# Altium PCB PCB1.PcbDoc
Units mm, origin at the board's own origin, x right, y up, seen from the top; angles counter-clockwise.
Board outline 180 x 80 mm, 2 copper layers (Top Layer, Bottom Layer); 75 components, 62 nets, 261 pads, 58 vias.
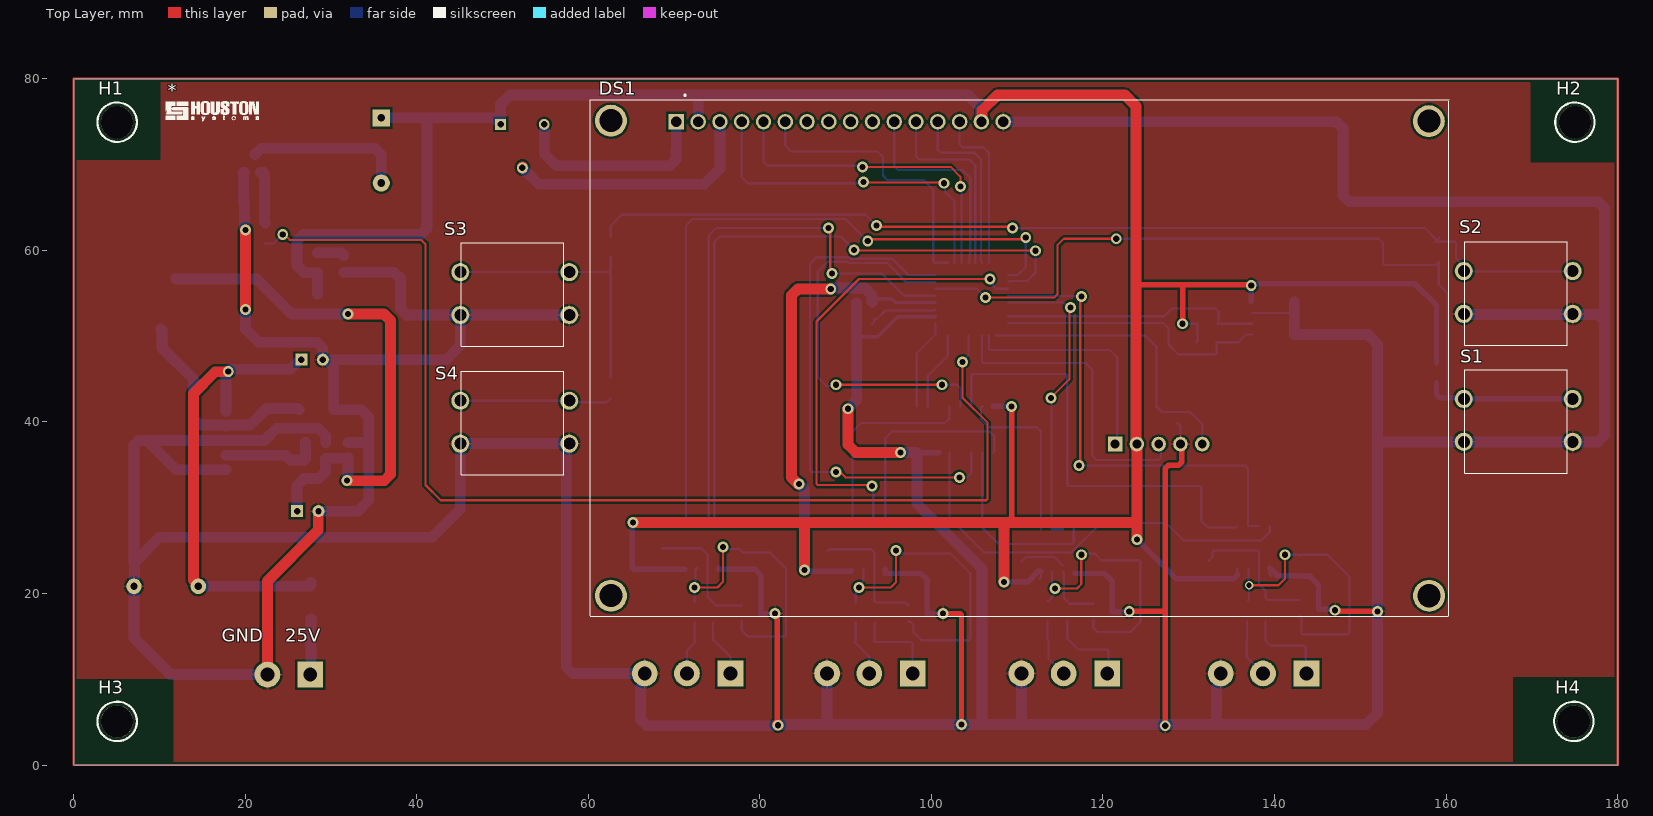
[diagram p0: Top Layer view]
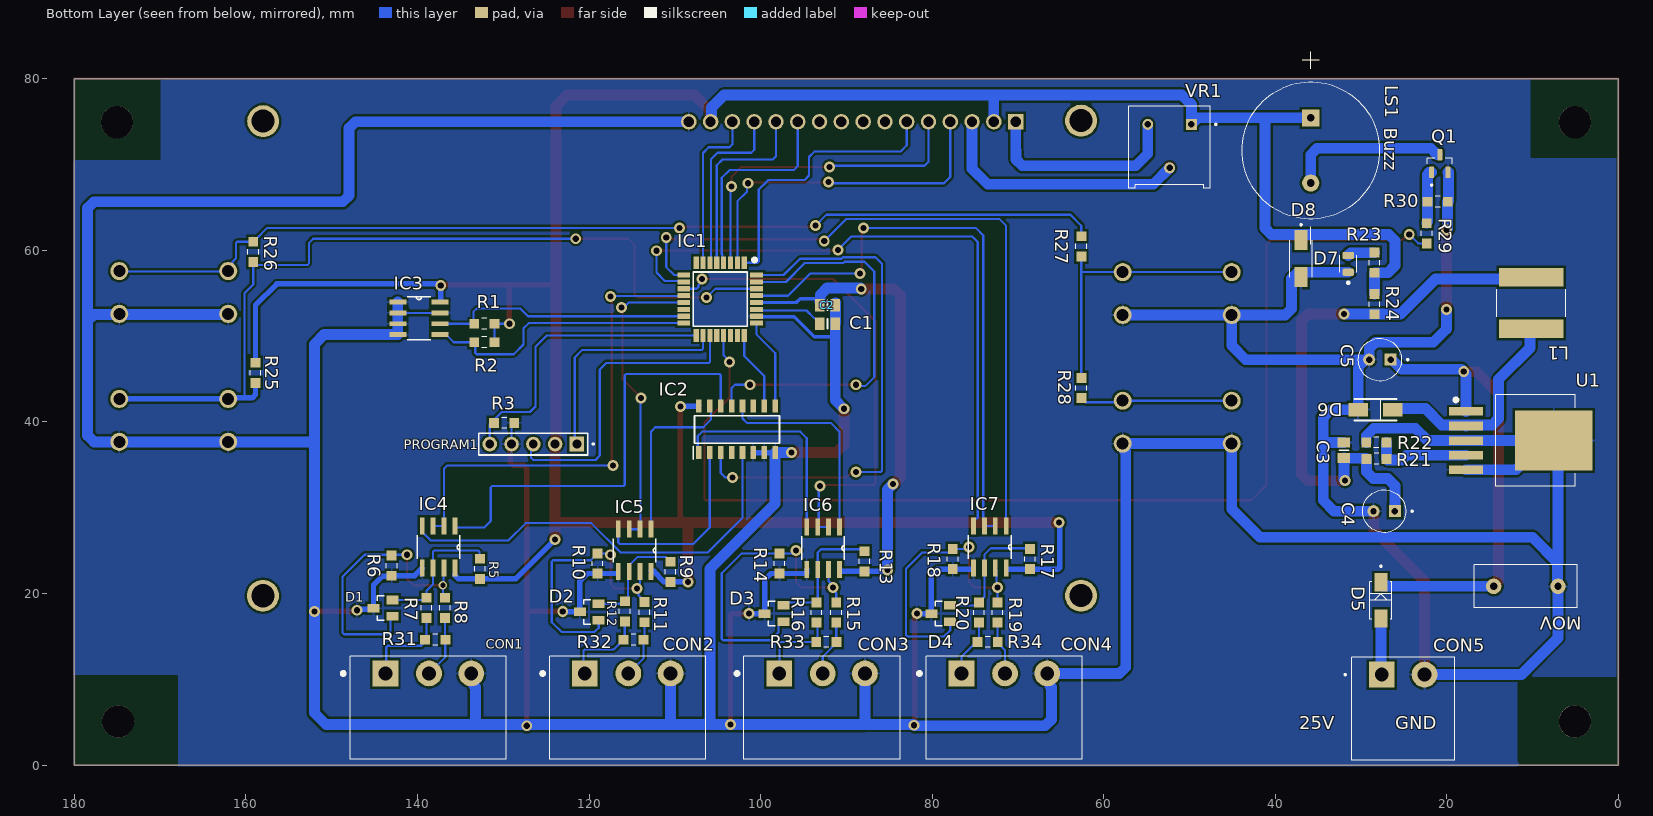
[diagram p1: Bottom Layer view, seen from below]
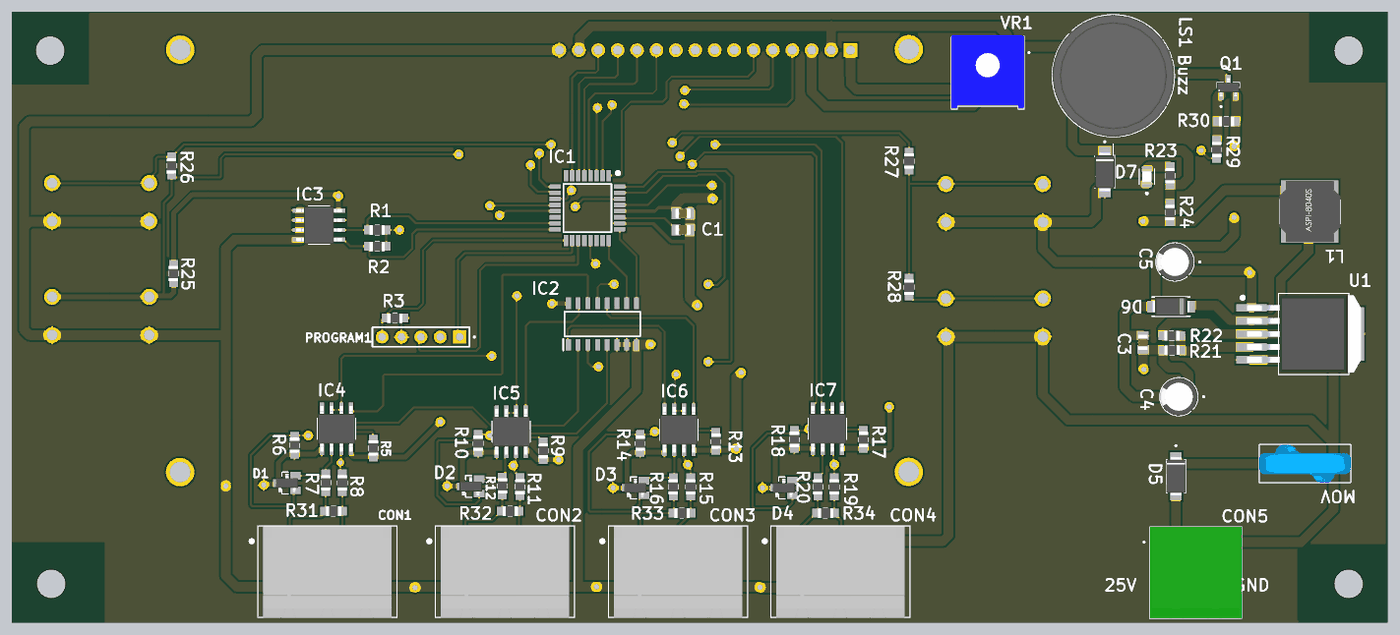
[diagram p2: 3D render of the assembled board from below, using the file's embedded part models]

## Layer stack, top to bottom
Top Solder: solder mask 0.0102, Solder Resist, Dk 3.5
Top Layer: signal copper 0.0356
Dielectric 1: dielectric 0.32, FR-4, Dk 4.8
Bottom Layer: signal copper 0.0356
Bottom Solder: solder mask 0.0102, Solder Resist, Dk 3.5

## Board outline
0,0 0,80 180,80 180,0

## Design rules (kind name [scope] priority, off if disabled: settings)
Clearance [All] p1: gap=0.254 ignorepadtopadclearanceinfootprint=TRUE
HoleSize [All] p1: absolutevalues=TRUE maxlimit=5 minlimit=0.025 maxpercent=80.000 minpercent=20.000
MinimumSolderMaskSliver [All] p1: minsoldermaskwidth=0.1
PolygonConnect [All] p1: connectstyle=Relief reliefconductorwidth=0.254 reliefentries=4 polygonreliefangle="90 Angle" airgapwidth=0.254
RoutingVias [All] p1: holewidth=0.711 width=1.27 viastyle="Through Hole" minholewidth=0.4 minwidth=0.8 maxholewidth=0.711 maxwidth=1.27
SilkToSilkClearance [All] p1: silktosilkclearance=0.1
SilkToSolderMaskClearance [IsPad] p1: minsilkscreentomaskgap=0.001 clearancetoexposedcopper=TRUE
SolderMaskExpansion [All] p1: expansion=0.102 istentingtop=FALSE
Width [All] p1: maxlimit=5.254 minlimit=0.254 preferedwidth=0.254
26 further rules are at their usual default settings.

## Classes and differential pairs
component class Power: * buzz C3 C4 C5 CON5 D5 D6 D7 D8 H1 H2 H3 H4 L1 LS1 MOV Q1 R21 R22 R23 R24 R29 R30 U1
component class main: C1 C2 dispaly DS1 IC1 IC3 PROGRAM1 R1 R2 R3 R25 R26 R27 R28 S1 S2 S3 S4 VR1
component class Commucation: CON1 CON2 CON3 CON4 D1 D2 D3 D4 IC2 IC4 IC5 IC6 IC7 R5 R6 R7 R8 R9 R10 R11 R12 R13 R14 R15 R16 R17 R18 R19 R20 R31 R32 R33 R34

## Components (designator, comment, footprint, x,y, rotation, side; value= is the part's Value field where it differs from the comment)
* "HOUSTON_LOGO" HOUSTON_LOGO 14.097,72.517 r0 top
C1 "CAP 0.1uF 50V 0805" "CAP CER 0.1uF/50V 5%" 92.202,51.435 r180 bottom
C2 "CAP 0.1uF 50V 0805" "CAP CER 0.1uF/50V 5%" 92.202,53.594 r180 bottom
C3 "CAP 0.1uF 50V 0805" "CAP CER 0.1uF/50V 5%" 32.004,36.703 r270 bottom
C4 "CAP ELE 10µF 25V TH" "CAP ELE 10µF 25V TH" 27.305,29.591 r0 bottom
C5 "CAP ELE 10µF 25V TH" "CAP ELE 10µF 25V TH" 27.813,47.244 r0 bottom
CON1 "3 Pin Terminal Block 5MM RA" "3 Pin Terminal Block 5MM RA" 138.731,10.668 r180 bottom
CON2 "3 Pin Terminal Block 5MM RA" "3 Pin Terminal Block 5MM RA" 115.49,10.668 r180 bottom
CON3 "3 Pin Terminal Block 5MM RA" "3 Pin Terminal Block 5MM RA" 92.838,10.668 r180 bottom
CON4 "3 Pin Terminal Block 5MM RA" "3 Pin Terminal Block 5MM RA" 71.581,10.668 r180 bottom
CON5 "2 Pin Terminal Block 5MM RA" "2 Pin Terminal Block 5MM RA" 27.606,10.541 r180 bottom
D1 "SM712-02HTG" SOT23 144.018,18.288 r90 bottom
D2 "SM712-02HTG" SOT23 119.972,17.846 r90 bottom
D3 "SM712-02HTG" SOT23 98.425,17.653 r90 bottom
D4 "SM712-02HTG" SOT23 78.994,17.653 r90 bottom
D5 "DIODE M7 DO-214AC" "DIODE M7 DO-214AC" 27.686,19.177 r270 bottom
D6 "SS54-HF" DIOM5025X220N 28.321,41.402 r0 bottom
D7 "LED-0805" LED-0805 31.496,58.42 r90 bottom
D8 "SZ1SMA5918BT3G" DIOM5226X220N 36.998,59.035 r270 bottom
DS1 "NHD-0420E2Z-FSW-GBW" LCD_NHD-0420E2Z-FSW-GBW 126.273,45.901 r0 top locked
H1 "ScrewHole_3.75mmD" "ScrewHole_3.75mmD - duplicate" 5.08,74.93 r0 top
H2 "ScrewHole_3.75mmD" "ScrewHole_3.75mmD - duplicate" 175.006,74.93 r0 top
H3 "ScrewHole_3.75mmD" "ScrewHole_3.75mmD - duplicate" 5.08,5.08 r0 top
H4 "ScrewHole_3.75mmD" "ScrewHole_3.75mmD - duplicate" 174.879,5.08 r0 top
IC1 "MG82F6D32AD32" QFP80P900X900X160-32N 104.705,54.309 r270 bottom
IC2 "CD4052BM" SOIC127P600X175-16N 102.743,39.116 r90 bottom
IC3 "AT24C512BN-SH25-B" SOIC127P600X175-8N 139.827,52.07 r180 bottom
IC4 "MAX485CSA" SOIC127P600X175-8N 137.541,25.4 r270 bottom
IC5 "MAX485CSA" SOIC127P600X175-8N 114.681,25.019 r270 bottom
IC6 "MAX485CSA" SOIC127P600X175-8N 92.71,25.273 r270 bottom
IC7 "MAX485CSA" SOIC127P600X175-8N 73.279,25.4 r270 bottom
L1 "INDUCTOR 8040S SWPA8040S120MT" "INDUCTOR 8040S SWPA8040S120MT" 10.16,53.848 r90 bottom
LS1 "Buzz" CUI_CMI-1614-1285T 35.871,71.636 r270 bottom
MOV "Ceramic capacitor 3300pF4KV" "Ceramic capacitor 3300pF4KV" 10.795,20.828 r0 bottom
PROGRAM1 "BURGE 5 PIN 2.54mm" "BURGE 5 PIN" 126.492,37.415 r180 bottom
Q1 "NPN SOT-23 SMT BC848C_RFG" "NPN SOT-23 SMT BC848C_RFG" 20.828,70.104 r90 bottom
R1 "RES 4.7K 0.25W 5% 0805" "RES 0805 10K/0.25W 5%" 132.207,51.435 r180 bottom
R2 "RES 47K 0.25W 5% 0805" "RES 0805 10K/0.25W 5%" 132.207,49.276 r180 bottom
R3 "RES 47K 0.25W 5% 0805" "RES 0805 10K/0.25W 5%" 129.889,39.878 r0 bottom
R5 "RES4.7K 0.25W 5% 0805" "RES 0805 10K/0.25W 5%" 132.715,22.86 r90 bottom
R6 "RES4.7K 0.25W 5% 0805" "RES 0805 10K/0.25W 5%" 143.002,23.241 r90 bottom
R7 "RES100E 0.25W 5% 0805" "RES 0805 10K/0.25W 5%" 138.938,18.32 r270 bottom
R8 "RES100E 0.25W 5% 0805" "RES 0805 10K/0.25W 5%" 136.779,18.32 r270 bottom
R9 "RES4.7K 0.25W 5% 0805" "RES 0805 10K/0.25W 5%" 110.49,22.511 r90 bottom
R10 "RES4.7K 0.25W 5% 0805" "RES 0805 10K/0.25W 5%" 118.999,23.495 r90 bottom
R11 "RES100E 0.25W 5% 0805" "RES 0805 10K/0.25W 5%" 113.538,17.812 r270 bottom
R12 "RES100E 0.25W 5% 0805" "RES 0805 10K/0.25W 5%" 115.824,17.907 r270 bottom
R13 "RES4.7K 0.25W 5% 0805" "RES 0805 10K/0.25W 5%" 87.884,23.749 r90 bottom
R14 "RES4.7K 0.25W 5% 0805" "RES 0805 10K/0.25W 5%" 97.79,23.495 r90 bottom
R15 "RES100E 0.25W 5% 0805" "RES 0805 10K/0.25W 5%" 91.186,17.78 r270 bottom
R16 "RES100E 0.25W 5% 0805" "RES 0805 10K/0.25W 5%" 93.472,17.78 r270 bottom
R17 "RES4.7K 0.25W 5% 0805" "RES 0805 10K/0.25W 5%" 68.58,24.003 r90 bottom
R18 "RES4.7K 0.25W 5% 0805" "RES 0805 10K/0.25W 5%" 77.597,24.003 r90 bottom
R19 "RES100E 0.25W 5% 0805" "RES 0805 10K/0.25W 5%" 72.39,17.78 r270 bottom
R20 "RES100E 0.25W 5% 0805" "RES 0805 10K/0.25W 5%" 74.549,17.78 r270 bottom
R21 "RES 3K 0.25W 5% 0805" "RES 0805 10K/0.25W 5%" 28.194,35.687 r0 bottom
R22 "RES 1K 0.25W 5% 0805" "RES 0805 10K/0.25W 5%" 28.226,37.592 r180 bottom
R23 "RES 3K 0.25W 5% 0805" "RES 0805 10K/0.25W 5%" 28.448,58.547 r90 bottom
R24 "RES 3K 0.25W 5% 0805" "RES 0805 10K/0.25W 5%" 28.448,53.721 r270 bottom
R25 "RES 10K 0.25W 5% 0805" "RES 0805 10K/0.25W 5%" 158.877,45.72 r90 bottom
R26 "RES 1K 0.25W 5% 0805" "RES 0805 10K/0.25W 5%" 159.131,59.817 r270 bottom
R27 "RES 1K 0.25W 5% 0805" "RES 0805 10K/0.25W 5%" 62.611,60.452 r90 bottom
R28 "RES 1K 0.25W 5% 0805" "RES 0805 10K/0.25W 5%" 62.611,43.942 r90 bottom
R29 "RES 1K 0.25W 5% 0805" "RES 0805 10K/0.25W 5%" 22.352,61.976 r270 bottom
R30 "RES 10K 0.25W 5% 0805" "RES 0805 10K/0.25W 5%" 21.082,65.659 r180 bottom
R31 "RES120E 0.25W 5% 0805" "RES 0805 10K/0.25W 5%" 137.922,14.605 r180 bottom
R32 "RES120E 0.25W 5% 0805" "RES 0805 10K/0.25W 5%" 114.808,14.605 r180 bottom
R33 "RES120E 0.25W 5% 0805" "RES 0805 10K/0.25W 5%" 92.329,14.351 r180 bottom
R34 "RES120E 0.25W 5% 0805" "RES 0805 10K/0.25W 5%" 73.533,14.351 r180 bottom
S1 "1241.1624.41" 1241162441 174.752,42.672 r180 top locked
S2 "1241.1624.41" 1241162441 174.752,57.578 r180 top locked
S3 "1241.1624.41" 1241162441 57.785,57.451 r180 top locked
S4 "1241.1624.41" 1241162441 57.785,42.465 r180 top locked
U1 "LM2576-5.0WU" DPAK6P170_1524X459L254X81N 11.45,37.817 r270 bottom
VR1 "3386F-1-103T" TRIM_3386F-1-103T 52.324,72.136 r180 bottom

## Footprints (in the part's own frame and the unit in brackets; to place one, negate y for a bottom-side part, rotate by r counter-clockwise, add the part's x,y. Pads: shape width x height; smd on the part's side, far side on the other; paste and mask are expansions set on the pad)
"2 Pin Terminal Block 5MM RA" [mm] "2 Pin Terminal Block HDR 5MM THT RA_OQ0271510000G"
  rect 3x3 hole 1.6: 1(0,0)
  round 3 hole 1.6: 2(5,0)
  silkscreen extent -4.35,-10 8.5,2, body extent -3.5,-10 8.5,2, height 8.5
"3 Pin Terminal Block 5MM RA" [mm] "3 Pin Terminal Block HDR 5MM THT RA 231-433_001-000"
  rect 3x3 hole 1.6: 1(-5,0)
  round 3 hole 1.6: 2(0.08,0) 3(5,0)
  silkscreen extent -10.11,-10 9.1,2, body extent -8.42,-10.06 8.38,1.94, height 8.97
1241162441 [mm]
  round 2.1 hole 1.4: 1(0,0) 2(12.7,0) 3(12.7,5) 4(0,5)
  silkscreen extent 0.65,-3.43 12.59,8.64
"BURGE 5 PIN" [mm] "MTSW-105-07-T-S-048 BURGE 5 PIN 2.54mm"
  rect 1.7x1.7 hole 1.02: 01(5.08,0)
  round 1.7 hole 1.02: 02(2.54,0) 03(0,0) 04(-2.54,0) 05(-5.08,0)
  silkscreen extent -6.35,-1.27 7.1,1.27
"CAP CER 0.1uF/50V 5%" [mm] "CAP CER 0.1uF/50V  Ceramic Capacitor X7R 0805 (2012 Metric) SMT"
  rect 1.15x1.45 smd: 1(-0.9,0) 2(0.9,0)
  silkscreen extent 0,-0.55 0,0.55, body extent -1,-0.63 1,0.63, height 1.35
"CAP ELE 10µF 25V TH" [mm] "10µF 25V Aluminum Electrolytic Capacitors Radial Lead Type THT, Dia-5mm, Pitch-2mm ECEA1EN100UI"
  round 1.4 hole 0.75: N(1.25,0)
  rect 1.4x1.4 hole 0.75: P(-1.25,0)
  silkscreen extent -3.35,-2.5 2.5,2.5, body extent -2.49,-2.5 2.5,2.5, height 11
"Ceramic capacitor 3300pF4KV" [mm] "Ceramic capacitor 3300pF4KV, Tension nominale 400Vac(r.m.s.), 4KV ESD, DE2E3SA332MA3BY02F"
  round 1.8 hole 0.85: 1(-3.75,0) 2(3.75,0)
  silkscreen extent -6,-2.5 6,2.5, body extent -6,-2.5 6,2.5, height 15
CUI_CMI-1614-1285T [mm]
  round 2 hole 0.9: N(3.8,0)
  rect 2x2 / inner round 2 / far side rect 2x2 hole 0.9: P(-3.8,0)
  silkscreen extent -11.53,-8 10.92,8, body extent -8,-8 8,8, height 12.5
"DIODE M7 DO-214AC" [mm] "M7 General Purpose SMD Rectifier Diode SMA (DO-214AC) 1A 1000V 1n4007  DIOM4325X250N"
  rect 2.12x1.5 smd: A(2.115,0) C(-2.115,0)
  silkscreen extent -4.1,-1.28 2.16,1.28, body extent -2.57,-1.28 2.57,1.28, height 2.5
DIOM5025X220N [mm]
  rect 2.25x1.55 smd: 1(-2,0) 2(2,0)
  silkscreen extent -2.47,-1.25 2.47,1.25, body extent -2.47,-1.25 2.47,1.25, height 2.2
DIOM5226X220N [mm]
  rect 2.32x1.55 smd: A(2.14,0) C(-2.14,0)
  silkscreen extent -4.05,-1.3 2.16,1.3, body extent -2.6,-1.31 2.6,1.31, height 2.21
DPAK6P170_1524X459L254X81N [mm]
  rect 1x4 smd: 1(-3.4,-6.33) 2(-1.7,-6.33) 3(0,-6.33) 4(1.7,-6.33) 5(3.4,-6.33)
  rect 7x9 smd: 6(0,3.91)
  silkscreen extent -5.33,-7.7 5.33,6.4, body extent -5.08,-6.92 5.08,7.99, height 4.83
HOUSTON_LOGO [mm]
  silkscreen extent -3.35,2.52 7.49,4.87
"INDUCTOR 8040S SWPA8040S120MT" [mm]
  rect 2.2x7.5 smd: 1(-3,0) 2(3,0)
  silkscreen extent -1.58,-4 1.58,4, body extent -4,-4 4,4, height 4
LCD_NHD-0420E2Z-FSW-GBW [mm]
  rect 1.8x1.8 / inner round 1.8 / far side rect 1.8x1.8 hole 1.2: 1(-56.007,29.083)
  round 1.8 hole 1.2: 2(-53.467,29.083) 3(-50.927,29.083) 4(-48.387,29.083) 5(-45.847,29.083) 6(-43.307,29.083) 7(-40.767,29.083) 8(-38.227,29.083) 9(-35.687,29.083) 10(-33.147,29.083) 11(-30.607,29.083) 12(-28.067,29.083) 13(-25.527,29.083) 14(-22.987,29.083) 15(-20.447,29.083) 16(-17.907,29.083)
  round 3.716 hole 2.7: SH1(-63.627,29.21) SH2(31.715,29.156) SH3(-63.627,-26.162) SH4(31.734,-26.181)
  silkscreen extent -66.04,-28.57 34.09,32.28, body extent -66.04,-28.45 34.04,31.75, height 0.25
LED-0805 [mm] "Red 640nm LED Indication - Discrete 1.85V 0805 (2012 Metric) SMT APT2012SRCPRV"
  rrect50% 0.86x1.36 smd: A(0.975,0) C(-0.975,0)
  silkscreen extent -2.3,-1 1,1, body extent -1,-0.63 1,0.63, height 0.75
"NPN SOT-23 SMT BC848C_RFG" [mm] "NPN SOT-23 SMT BC848C_RFG SOT95P237X112-3N"
  rrect25% 1.32x0.59 smd: 1(-1.015,0.95) 2(-1.015,-0.95) 3(1.015,0)
  silkscreen extent -2.6,-1.46 0.65,1.46, body extent -1.19,-1.46 1.19,1.46, height 1.12
QFP80P900X900X160-32N [mm]
  rect 1.475x0.6 smd: 1(-4.238,2.8) 2(-4.238,2) 3(-4.238,1.2) 4(-4.238,0.4) 5(-4.238,-0.4) 6(-4.238,-1.2) 7(-4.238,-2) 8(-4.238,-2.8) 17(4.238,-2.8) 18(4.238,-2) 19(4.238,-1.2) 20(4.238,-0.4) 21(4.238,0.4) 22(4.238,1.2) 23(4.238,2) 24(4.238,2.8)
  rect 0.6x1.475 smd: 9(-2.8,-4.238) 10(-2,-4.238) 11(-1.2,-4.238) 12(-0.4,-4.238) 13(0.4,-4.238) 14(1.2,-4.238) 15(2,-4.238) 16(2.8,-4.238) 25(2.8,4.238) 26(2,4.238) 27(1.2,4.238) 28(0.4,4.238) 29(-0.4,4.238) 30(-1.2,4.238) 31(-2,4.238) 32(-2.8,4.238)
  silkscreen extent -4.77,-3.15 3.15,4.2
"RES 0805 10K/0.25W 5%" [mm] "RESISTOR, THICK FILM, 10K, 5%, 0805, SMT FULL REEL Product Range:PANASONIC - ERJ Series"
  rect 1.15x1.15 smd: 1(-1.175,0) 2(1.175,0)
  silkscreen extent -0.28,-0.62 0.28,0.62, body extent -1,-0.63 1,0.63, height 0.7
"ScrewHole_3.75mmD - duplicate" [mm] "SCREW HEAD DIA 4.5MM, SREW LEG DIA 3 MM"
  round 3.75 hole 3.75 unplated: 1(0,0)
  silkscreen extent -2.3,-2.3 2.3,2.3
SOIC127P600X175-8N [mil]
  rect 78x22 smd: 1(-97,75) 2(-97,25) 3(-97,-25) 4(-97,-75) 5(97,-75) 6(97,-25) 7(97,25) 8(97,75)
  silkscreen extent -54,-98 54,98, body extent -118,-96 118,96, height 69
SOIC127P600X175-16N [mm]
  rect 1.525x0.65 smd: 1(-2.712,4.445) 2(-2.712,3.175) 3(-2.712,1.905) 4(-2.712,0.635) 5(-2.712,-0.635) 6(-2.712,-1.905) 7(-2.712,-3.175) 8(-2.712,-4.445) 9(2.712,-4.445) 10(2.712,-3.175) 11(2.712,-1.905) 12(2.712,-0.635) 13(2.712,0.635) 14(2.712,1.905) 15(2.712,3.175) 16(2.712,4.445)
  silkscreen extent -3.47,-4.95 1.6,5.12
SOT23 [mm]
  rect 1x1.4 smd: 1(-0.95,-1.1) 2(0.95,-1.1) 3(0,1.1)
  silkscreen extent -1.42,-0.15 1.42,0.66, body extent -1.18,-1.46 1.18,1.46, height 1.12
TRIM_3386F-1-103T [mm]
  rect 1.268x1.268 / inner round 1.268 / far side rect 1.268x1.268 hole 0.76: 1(2.54,2.54)
  round 1.268 hole 0.76: 2(0,-2.54) 3(-2.54,2.54)
  silkscreen extent -4.76,-4.88 5.5,4.68, body extent -4.76,-4.76 4.76,4.76, height 4.83

## Part data
C1 C2 C3: library part "CAP CER 0.1uF/50V 5%", "CAP CER 0.1uF/50V  Ceramic Capacitor X7R 0805 (2012 Metric) SMT", Package="0805 Samsung", Check_prices=https://www.snapeda.com/parts/CL21B104KCFNNNE/Samsung+Electro-Mechanics/view-part/?ref=eda, Digi-Key_Part_Number=1276-6840-2-ND, MF=Samsung, MP=CL21B104KCFNNNE, Purchase-URL=https://pricing.snapeda.com/search?q=CL21B104KCFNNNE&ref=eda, SnapEDA_Link=https://www.snapeda.com/parts/CL21B104KCFNNNE/Samsung+Electro-Mechanics/view-part/?ref=snap
C4 C5: library part "CAP ELE 10µF 25V TH_1", "10µF 25V Aluminum Electrolytic Capacitors Radial Lead Type THT, Dia-5mm, Pitch-2mm ECEA1EN100UI", Package="RADIAL-2 Panasonic", Check_prices=https://www.snapeda.com/parts/ECEA1EN100UI/Panasonic/view-part/5788532/?ref=eda, Digi-Key_Part_Number=ECE-A1EN100UI-ND, MF=Panasonic, MP=ECEA1EN100UI, Purchase-URL=https://pricing.snapeda.com/search/part/ECEA1EN100UI/?ref=eda, SnapEDA_Link=https://www.snapeda.com/parts/ECEA1EN100UI/Panasonic/view-part/5788532/?ref=snap
CON1 CON2 CON3 CON4: "3 Pin Terminal Block HDR 5MM THT RA 231-433_001-000", Package=None, Availability=Unavailable, MF=WAGO, MP=231-433/001-000, Price=None, SnapEDA_Link=https://www.snapeda.com/parts/231-433/001-000/WAGO/view-part/482062/?ref=snap
CON5: "2 Pin Terminal Block HDR 5MM THT RA _OQ0271510000G", Package=None, Check_prices=https://www.snapeda.com/parts/OQ0271510000G/Amphenol/view-part/?ref=eda, MF="Amphenol Anytek", MP=OQ0271510000G, SnapEDA_Link=https://www.snapeda.com/parts/OQ0271510000G/Amphenol/view-part/?ref=snap
D1 D2 D3 D4: "TVS Diode, SM712 Series, 31V Clamp, 600W Peak Pulse, Surface Mount, SOT23-3", Package="SOT-23 Littelfuse Inc.", Check_prices=https://www.snapeda.com/parts/SM712-02HTG/Littelfuse/view-part/?ref=eda, MF="Littelfuse Inc.", MP=SM712-02HTG, SnapEDA_Link=https://www.snapeda.com/parts/SM712-02HTG/Littelfuse/view-part/?ref=snap
D5: "M7 General Purpose SMD Rectifier Diode SMA (DO-214AC) 1A 1000V 1n4007 RS2MA", Package="DO-214AC-2 Taiwan Semiconductor", Check_prices=https://www.snapeda.com/parts/RS2MA/Taiwan+Semiconductor/view-part/?ref=eda, MF="Taiwan Semiconductor", MP=RS2MA, SnapEDA_Link=https://www.snapeda.com/parts/RS2MA/Taiwan+Semiconductor/view-part/?ref=snap
D6: "Diode Schottky 40 V 5A Surface Mount DO-214AC (SMA)", Package="DO-214AC-214 Comchip Technology", Check_prices=https://www.snapeda.com/parts/SS54-HF/Comchip/view-part/?ref=eda, MF="Comchip Technology", MP=SS54-HF, SnapEDA_Link=https://www.snapeda.com/parts/SS54-HF/Comchip/view-part/?ref=snap
D7: "Red 640nm LED Indication - Discrete 1.85V 0805 (2012 Metric) SMT APT2012SRCPRV", Package="0805 Kingbright", Check_prices=https://www.snapeda.com/parts/APT2012SRCPRV/Kingbright/view-part/?ref=eda, MF=Kingbright, MP=APT2012SRCPRV, SnapEDA_Link=https://www.snapeda.com/parts/APT2012SRCPRV/Kingbright/view-part/?ref=snap
D8: "Zener Diode 5.1 V 1.5 W Â±5% Surface Mount SMA", Package="SMA-2 ON Semiconductor", Check_prices=https://www.snapeda.com/parts/SZ1SMA5918BT3G/Onsemi/view-part/?ref=eda, MF="ON Semiconductor", MP=SZ1SMA5918BT3G, SnapEDA_Link=https://www.snapeda.com/parts/SZ1SMA5918BT3G/Onsemi/view-part/?ref=snap
DS1: "Character Display Modules LCD NHD 4x20 STN Gray Transflective 8-Bit Parallel", Package=None, Check_prices=https://www.snapeda.com/parts/NHD-0420E2Z-FSW-GBW/Newhaven+Display/view-part/?ref=eda, MF="Newhaven Display", MP=NHD-0420E2Z-FSW-GBW, SnapEDA_Link=https://www.snapeda.com/parts/NHD-0420E2Z-FSW-GBW/Newhaven+Display/view-part/?ref=snap
H1 H2 H3 H4: "SCREW HEAD DIA 4.5MM, SREW LEG DIA 3 MM"
IC1: "Single-chip 8-bits microcontroller", Manufacturer_Name=Megawin, Datasheet Link=https://www.sunrom.com/p/mg82f6d32-megawin-mg82f6d32ad32-lqfp32-ic, Geometry.Height=1.6mm, Manufacturer_Part_Number=MG82F6D32AD32
IC2: "CMOS Differential 4-Channel Analog Multiplexer/Demultiplexer with Logic-Level Conversion", Manufacturer_Name="Texas Instruments", Mouser Part Number=595-CD4052BM, Arrow Part Number=CD4052BM, Arrow Price/Stock=https://www.arrow.com/en/products/cd4052bm/texas-instruments?region=nac, Datasheet Link=http://www.ti.com/lit/ds/symlink/cd4052b.pdf, Geometry.Height=1.75mm, Manufacturer_Part_Number=CD4052BM, Mouser Price/Stock=https://www.mouser.co.uk/ProductDetail/Texas-Instruments/CD4052BM?qs=LSR%252BNeaw%2FwAMfT6cddU6yA%3D%3D
IC3: "Two-wire Serial EEPROM", Manufacturer_Name=Microchip, Mouser Part Number=556-A24C512BNSH25-B, Datasheet Link=https://datasheet.datasheetarchive.com/originals/distributors/Datasheets_SAMA/4105ab7231f9d8c0ae47044db4ac63a0.pdf, Geometry.Height=1.75mm, Manufacturer_Part_Number=AT24C512BN-SH25-B, Mouser Price/Stock=https://www.mouser.com/Search/Refine.aspx?Keyword=556-A24C512BNSH25-B
IC4 IC5 IC6 IC7: "Maxim MAX485CSA, Line Transceiver, RS-422, RS-485, 4.75  5.25 V, 8-Pin SOIC", Manufacturer_Name="Analog Devices", Mouser Part Number=N/A, Datasheet Link=https://datasheets.maximintegrated.com/en/ds/MAX1487-MAX491.pdf, Geometry.Height=1.75mm, Manufacturer_Part_Number=MAX485CSA, Mouser Price/Stock=https://www.mouser.co.uk/ProductDetail/Maxim-Integrated/MAX485CSA?qs=LHmEVA8xxfbb%2FSUlm%252BHF3Q%3D%3D
L1: "SWPA8040S120MT SMD 8.0×8.0x4.0mm 8040S 12uH Â±20% 2.8A 142 mOhm SMT Shielded Wirewound Inductor", Package="Nonstandard Abracon LLC", Availability="In Stock", Check_prices=https://www.snapeda.com/parts/ASPI-8040S-510M-T/Abracon+LLC/view-part/?ref=eda, MF="Abracon LLC", MP=ASPI-8040S-510M-T, Price=None, Purchase-URL=https://pricing.snapeda.com/search/part/ASPI-8040S-510M-T/?ref=eda, SnapEDA_Link=https://www.snapeda.com/parts/ASPI-8040S-510M-T/Abracon+LLC/view-part/?ref=snap
LS1: library part CMI-1614-1285T, "16 mm, 12 Vdc, 85 dB, Through Hole, Driving Circuit, Magnetic Audio Indicator Buzzer", Package="CUI Inc.", Check_prices=https://www.snapeda.com/parts/CMI-1614-1285T/Same+Sky/view-part/?ref=eda, MF="Same Sky", MP=CMI-1614-1285T, SnapEDA_Link=https://www.snapeda.com/parts/CMI-1614-1285T/Same+Sky/view-part/?ref=snap
MOV: "Ceramic capacitor 3300pF4KV, Tension nominale 400Vac(r.m.s.), 4KV ESD, DE2E3SA332MA3BY02F", Package=NONSTANDARD, Availability=Bad, Check_prices=https://www.snapeda.com/parts/DE2E3SA332MA3BY02F/Murata/view-part/2799752/?ref=eda, MF=Murata, MP=DE2E3SA332MA3BY02F, Price=None, Purchase-URL=https://pricing.snapeda.com/search/part/DE2E3SA332MA3BY02F/?ref=eda, SnapEDA_Link=https://www.snapeda.com/parts/DE2E3SA332MA3BY02F/Murata/view-part/2799752/?ref=snap
PROGRAM1: library part "BURGE 5 PIN", "MTSW-105-07-T-S-048 BURGE 5 PIN 2.54mm", Package=None, Availability=Unavailable, MP=MTSW-105-07-T-S-048, Price=None
Q1: "NPN SMT BC848C_RFG SOT-23, 30V, 0.1A, NPN Transistor", Package="SOT-23 Taiwan Semiconductor", Check_prices=https://www.snapeda.com/parts/BC848C%20RFG/Taiwan+Semiconductor/view-part/?ref=eda, MF="Taiwan Semiconductor", MP="BC848C RFG", SnapEDA_Link=https://www.snapeda.com/parts/BC848C%20RFG/Taiwan+Semiconductor/view-part/?ref=snap
R1 R2 R3 R6 R7 R8 R9 R10 R11 R12 R13 R14 R15 R16 R17 R18 R19 R20 R21 R22 R23 R24 R26 R27 R28 R29: library part "RES 10K 0.25W 5% 0805", "RESISTOR, THICK FILM, 10K, 5%, 0805 0.25W SMT", Package="805-2 Panasonic", Availability="In Stock", Check_prices=https://www.snapeda.com/parts/ERJ-6GEYJ103V/Panasonic+Electronic+Components/view-part/?ref=eda, MF="Panasonic Electronic", MP=ERJ-6GEYJ103V, Price=None, Purchase-URL=https://pricing.snapeda.com/search/part/ERJ-6GEYJ103V/?ref=eda, SnapEDA_Link=https://www.snapeda.com/parts/ERJ-6GEYJ103V/Panasonic+Electronic+Components/view-part/?ref=snap
R5: library part "RES 10K 0.25W 5% 0805", "RESISTOR, THICK FILM, 4.7K, 5%, 0805 0.25W SMT", Package="805-2 Panasonic", Availability="In Stock", Check_prices=https://www.snapeda.com/parts/ERJ-6GEYJ103V/Panasonic+Electronic+Components/view-part/?ref=eda, MF="Panasonic Electronic", MP=ERJ-6GEYJ103V, Price=None, Purchase-URL=https://pricing.snapeda.com/search/part/ERJ-6GEYJ103V/?ref=eda, SnapEDA_Link=https://www.snapeda.com/parts/ERJ-6GEYJ103V/Panasonic+Electronic+Components/view-part/?ref=snap
R25 R30: "RESISTOR, THICK FILM, 10K, 5%, 0805 0.25W SMT", Package="805-2 Panasonic", Availability="In Stock", Check_prices=https://www.snapeda.com/parts/ERJ-6GEYJ103V/Panasonic+Electronic+Components/view-part/?ref=eda, MF="Panasonic Electronic", MP=ERJ-6GEYJ103V, Price=None, Purchase-URL=https://pricing.snapeda.com/search/part/ERJ-6GEYJ103V/?ref=eda, SnapEDA_Link=https://www.snapeda.com/parts/ERJ-6GEYJ103V/Panasonic+Electronic+Components/view-part/?ref=snap
R31 R32 R33 R34: library part "RES 10K 0.25W 5% 0805_1", "RESISTOR, THICK FILM, 10K, 5%, 0805 0.25W SMT", Package="805-2 Panasonic", Availability="In Stock", Check_prices=https://www.snapeda.com/parts/ERJ-6GEYJ103V/Panasonic+Electronic+Components/view-part/?ref=eda, MF="Panasonic Electronic", MP=ERJ-6GEYJ103V, Price=None, Purchase-URL=https://pricing.snapeda.com/search/part/ERJ-6GEYJ103V/?ref=eda, SnapEDA_Link=https://www.snapeda.com/parts/ERJ-6GEYJ103V/Panasonic+Electronic+Components/view-part/?ref=snap
S1 S2 S3 S4: "Push button for PCB mounting", Manufacturer_Name=SCHURTER, Datasheet Link=https://www.schurter.com/en/datasheet/PMS, Geometry.Height=7.6mm, Manufacturer_Part_Number=1241.1624.41
U1: "Buck Switching Regulator IC Positive Fixed 5V 1 Output 3A TO-263-6, D2PAK (5 Leads + Tab), TO-263BA", Package="TO-263-5 Micrel", Check_prices=https://www.snapeda.com/parts/LM2576-5.0WU/Microchip/view-part/?ref=eda, MF=Microchip, MP=LM2576-5.0WU, SnapEDA_Link=https://www.snapeda.com/parts/LM2576-5.0WU/Microchip/view-part/?ref=snap
VR1: "10 kOhms 0.5W, 1/2W PC Pins Through Hole Trimmer Potentiometer Cermet 1.0 Turn Top Finger Adjustment", Package="3386F-3 Bourns", Availability="In Stock", Check_prices=https://www.snapeda.com/parts/3386F-1-103/Bourns/view-part/?ref=eda, MF=Bourns, MP=3386F-1-103, Price=None, Purchase-URL=https://pricing.snapeda.com/search/part/3386F-1-103/?ref=eda, SnapEDA_Link=https://www.snapeda.com/parts/3386F-1-103/Bourns/view-part/?ref=snap

## Via types
v1: diameter 1.27, hole 0.711, Top Layer to Bottom Layer, 57 vias
v2: diameter 1, hole 0.6, Top Layer to Bottom Layer, 1 vias

## Nets (pads, with @x,y where several pads share a name; then routed paths per layer and width w, separated by ;. In a path a pad name is that pad's centre, name@x,y a point inside that pad or via, vN(x,y) a via of type N, cw(c..) or ccw(c..) an arc to the next point about the centre after c; other vN are vias at no path point)
5v: C2.1 D8.C DS1.2 DS1.15 IC1.28 IC2.16 IC3.8 IC4.8 IC5.8 IC6.8 IC7.8 LS1.P PROGRAM1.02 R1.2 R2.2 R5.1 R9.1 R13.1 R17.1 R23.1 R24.1 R25.2 VR1.1 | length 416
  Top Layer w0.254: 124.206,56.134 124.333,56.007 ; v1@136.779,56.007 136.991,55.795 137.202,55.795 v1(137.287,55.88)
  Top Layer w0.635: 108.775,28.258 109.347,28.829 v1(109.347,41.783) ; 124.333,56.007 129.286,56.007 ; v1(129.286,51.435) 129.286,56.007 ; v1(137.287,55.88) 137.165,56.002 136.716,56.002 136.711,56.007 129.286,56.007
  Top Layer w1.27: v1(65.215,28.258) 85.217,28.258 ; v1(84.582,32.766) 84.455,32.766 83.693,33.528 83.693,54.755 84.437,55.499 v1(88.265,55.499) ; v1(85.217,22.733) 85.217,28.258 ; DS1.15 105.918,75.076 105.918,76.327 107.696,78.105 122.555,78.105 123.825,76.835 123.825,37.846 123.907,37.764 123.907,37.46 PROGRAM1.02 v1(123.952,26.289) ; v1(108.458,21.336) 108.458,28.13 ; 123.825,28.258 108.775,28.258 85.217,28.258
  Bottom Layer w0.254: 65.151,22.977 65.3,22.828 ; v1@65.151,28.194 v1(65.215,28.258) ; IC7.8@71.266,22.828 IC7.8 ; IC6.8@90.653,22.574 90.805,22.726 IC6.8 ; IC2.16@107.188,41.813 IC2.16 ; IC5.8@112.624,21.692 112.776,21.844 IC5.8 ; v1(129.286,51.435) R1.2 131.032,49.403 R2.2@130.905,49.276 ; IC4.8@135.636,22.225 IC4.8 ; IC3.8@137.287,54.051 IC3.8 ; v1(137.287,55.88) v1@137.481,56.074
  Bottom Layer w0.4: C2.1@93.102,53.975 93.102,53.981 93.477,54.356 95.377,54.356 95.824,53.909 IC1.28
  Bottom Layer w0.635: 65.151,22.977 v1@65.151,28.194 ; 65.3,22.828 R17.1 IC7.8@71.266,22.828 ; v1(85.217,22.733) 85.389,22.733 85.548,22.574 R13.1 IC6.8@90.653,22.574 ; IC2.16@107.188,41.813 107.196,41.806 109.324,41.806 v1(109.347,41.783) ; v1(108.458,21.336) R9.1 111.265,21.336 111.637,21.708 112.037,22.192 112.222,22.378 112.408,22.564 112.672,22.564 112.767,22.564 IC5.8 ; v1(123.952,26.289) 128.556,21.685 132.94,21.685 132.973,21.717 135.264,21.717 135.636,22.089 IC4.8@135.636,22.225 ; IC3.8@137.287,54.051 v1(137.287,55.88) ; v1@137.481,56.074 156.397,56.074 158.877,53.594 R25.2
  Bottom Layer w1.254: R24.1 R23.1 26.875,57.372 26.035,58.212 26.035,61.114 26.77,61.849 40.46,61.849 41.194,62.584 41.194,75.436 ; LS1.P 41.194,75.436 ; DS1.2@72.817,74.995 72.817,78.105 ; 72.817,78.14 72.817,78.105 ; DS1.15 105.722,75.088 105.722,76.65 104.267,78.105 72.817,78.105 ; 41.194,75.436 49.024,75.436 VR1.1 49.784,76.989 50.9,78.105 72.817,78.105
  Bottom Layer w1.27: v1(84.582,32.766) 85.217,32.131 v1(85.217,22.733) ; v1(88.265,55.499) 88.355,55.589 92.245,55.589 93.042,54.792 93.042,54.035 C2.1@93.102,53.975
A: IC1.24 IC2.10 | length 9.2
  Bottom Layer w0.254: IC2.10 99.568,45.339 101.905,47.676 IC1.24
B: IC1.25 IC2.9 | length 10.6
  Bottom Layer w0.254: IC2.9 98.298,48.006 100.457,50.165 100.457,51.499 IC1.25
Buzzer: IC1.21 R29.2 | length 134.5
  Top Layer w0.254: v1(24.384,61.849) 24.551,61.849 25.186,61.214 40.513,61.214 41.021,60.706 41.021,32.639 42.799,30.861 106.404,30.861 106.553,31.01 106.553,39.878 103.632,42.799 v1(103.632,46.99)
  Bottom Layer w0.254: R29.2 23.336,60.801 v1(24.384,61.849) ; v1(103.632,46.99) 103.632,47.081 104.305,47.754 IC1.21
D4: DS1.11 IC1.4 | length 24.6
  Bottom Layer w0.254: DS1.11 95.666,69.815 96.139,69.342 103.632,69.342 104.521,68.453 104.521,59.539 104.424,59.442 104.424,58.666 IC1.4
D5: DS1.12 IC1.5 | length 22.7
  Bottom Layer w0.254: DS1.12 98.206,70.958 98.587,70.577 104.429,70.577 105.105,69.901 IC1.5
D6: DS1.13 IC1.6 | length 20.9
  Bottom Layer w0.254: DS1.13 100.746,71.72 101.092,71.374 105.029,71.374 105.786,70.617 105.786,58.666 IC1.6
D7: DS1.14 IC1.7 | length 19.3
  Bottom Layer w0.254: DS1.14 103.286,72.355 103.632,72.009 106.045,72.009 106.705,71.349 IC1.7
E: DS1.6 IC1.1 | length 33.5
  Bottom Layer w0.254: DS1.6 82.966,72.228 83.693,71.501 93.726,71.501 94.361,70.866 94.361,68.707 94.869,68.199 99.084,68.199 100.203,67.08 100.203,58.696 100.352,58.547 IC1.1
GND: C1.2 C2.2 C3.1 C4.N C5.N CON1.3 CON2.3 CON3.3 CON4.3 CON5.2 D1.3 D2.3 D3.3 D4.3 D6.2 D7.C D8.A DS1.16 IC1.26 IC2.6 IC2.7 IC2.8 IC3.1 IC3.2 IC3.3 IC3.4 IC3.7 IC4.5 IC5.5 IC6.5 IC7.5 MOV.1 PROGRAM1.04 Q1.2 R3.1 R6.1 R10.1 R14.1 R18.1 R22.1 R30.2 S1.3 S1.4 S2.3 S2.4 S3.3 S3.4 S4.3 S4.4 U1.3 U1.5 U1.6 | length 814.8
  Top Layer w0.254: 103.356,17.653 103.505,17.504
  Top Layer w0.635: v1(81.788,17.653) 82.042,17.399 v1@82.042,4.699 ; v1(101.346,17.653) 103.356,17.653 ; v1(103.505,4.699) 103.505,17.504 ; v1(123.063,17.907) 127.254,17.907 ; v1(127.254,4.572) 127.254,17.907 ; PROGRAM1.04 129.159,37.288 129.159,35.297 128.787,34.925 127.626,34.925 127.254,34.553 127.254,17.907 ; v1(147.066,18.034) 147.193,17.907 v1(152.019,17.907)
  Top Layer w1.254: CON5.2 22.606,21.463 28.527,27.384 C4.N@28.527,29.591
  Top Layer w1.27: v1(20.066,53.086) v1(20.066,62.357) ; v1@82.042,4.699 v1(82.105,4.635) ; v1(90.297,41.529) 90.297,37.33 91.178,36.449 v1(96.393,36.449)
  Bottom Layer w0.254: IC2.8@98.253,36.449 IC2.8 ; 105.918,4.826 106.045,4.699 ; IC5.5 116.586,22.472 IC5.5@116.738,22.32 ; D2.3 D2.3@121.133,17.907 ; R3.1@128.619,39.783 R3.1 129.032,39.56 PROGRAM1.04 ; IC3.7 IC3.2 ; IC4.5 139.446,22.225 IC4.5@139.605,22.066
  Bottom Layer w0.4: 91.44,49.911 93.726,49.911 96.078,52.263 100.421,52.263 IC1.26
  Bottom Layer w0.635: IC7.5 75.184,22.866 75.222,22.828 R18.1 79.407,22.828 80.094,22.141 D4.3 v1(81.788,17.653) ; IC6.5 94.615,22.358 94.653,22.32 R14.1 98.806,22.32 99.525,21.601 D3.3 v1(101.346,17.653) ; IC2.8 IC2.7 IC2.6 ; IC5.5@116.738,22.32 R10.1 120.174,22.32 121.072,21.422 D2.3 ; D2.3@121.133,17.907 121.164,17.876 123.032,17.876 v1(123.063,17.907) ; IC4.5 140.316,22.066 R6.1 143.092,21.976 144.14,21.976 145.118,20.998 D1.3@145.118,18.415 ; D1.3 145.118,18.218 145.183,18.153 146.947,18.153 v1(147.066,18.034)
  Bottom Layer w1.254: 7.045,23.609 U1.6@7.045,37.322 ; U1.6 U1.6@8.54,37.817 ; U1.5 11.94,34.417 U1.6@8.54,37.817 ; R30.2@19.812,65.754 19.812,69.088 19.813,69.089 Q1.2 ; 21.59,49.276 28.328,49.276 29.063,48.541 C5.N 43.434,47.244 45.085,48.895 45.085,52.324 S3.3 38.835,52.451 38.1,53.186 38.1,56.71 37.365,57.445 D7.C ; CON5.2 11.303,10.541 7.045,14.799 MOV.1 7.099,20.882 7.099,23.609 10.033,26.543 41.783,26.543 45.085,29.845 S4.3 ; C4.N 33.147,29.591 34.417,30.861 34.417,37.465 ; R22.1 29.401,38.381 28.539,39.243 23.678,39.243 22.252,37.817 U1.3 U1.6@8.54,37.817 ; C5.N@29.541,47.216 30.321,46.436 D6.2 33.528,41.402 34.417,40.513 34.417,37.465 ; C3.1 34.279,37.603 34.417,37.465 ; S4.4 57.623,37.303 57.623,36.705 57.448,36.53 57.448,11.403 58.182,10.668 CON4.3
  Bottom Layer w1.27: R30.2 19.907,62.516 v1(20.066,62.357) ; v1(20.066,53.086) 20.066,50.8 21.59,49.276 ; S4.3 S4.4 ; S3.3@45.085,52.324 45.212,52.451 S3.4 ; CON4.3 66.25,10.337 66.25,9.225 66.084,9.059 66.084,5.316 66.828,4.572 82.042,4.572 v1(82.105,4.635) 82.169,4.699 87.884,4.699 ; CON3.3 87.838,4.745 87.884,4.699 ; v1(90.297,41.529) 91.302,42.534 C1.2 91.246,51.491 C2.2@91.246,53.885 ; v1(96.393,36.449) IC2.8@98.253,36.449 ; IC2.8 98.298,30.48 105.918,22.86 105.918,4.826 ; DS1.16 147.211,74.984 147.955,74.24 147.955,66.403 148.699,65.659 177.691,65.659 178.435,64.915 178.435,51.787 ; CON2.3 110.49,4.953 110.236,4.699 ; v1@127.127,4.699 110.236,4.699 ; v1(127.254,4.572) 127.381,4.699 132.987,4.699 ; CON1.3 133.4,10.337 133.4,9.236 133.223,9.059 133.223,4.935 132.987,4.699 ; IC3.1 IC3.2 IC3.3 IC3.4 150.876,50.165 152.019,49.022 152.019,37.672 ; S1.3 152.019,37.672 ; S1.3@162.435,37.672 S1.4 177.691,37.672 178.435,38.416 178.435,51.787 ; S2.3@162.687,52.531 175.387,52.531 177.691,52.531 178.435,51.787 ; 87.884,4.699 v1(103.505,4.699) 106.045,4.699 110.236,4.699 ; 132.987,4.699 150.622,4.699 152.019,6.096 v1(152.019,17.907) 152.019,37.672
KEY: IC1.30 R25.1 R26.2 S1.1 S1.2 | length 101.8
  Top Layer w0.254: v1(106.299,54.483) 114.3,54.483 114.681,54.864 114.681,60.579 115.443,61.341 v1(121.539,61.341)
  Bottom Layer w0.254: IC1.30 105.273,55.509 v1(106.299,54.483) ; v1(121.539,61.341) 152.146,61.341 152.654,60.833 152.654,58.442 152.803,58.293 158.782,58.293 R26.2 159.131,56.007 160.147,54.991 160.147,42.799
  Bottom Layer w0.635: R25.1 158.877,43.171 159.249,42.799 160.147,42.799 161.925,42.799 S1.2 S1.1
MRX: IC1.31 IC2.13 | length 46.9
  Top Layer w0.254: v1(88.9,44.323) v1(101.219,44.323)
  Bottom Layer w0.254: v1(88.9,44.323) 88.773,44.196 87.757,44.196 86.741,45.212 86.741,57.531 87.882,58.672 90.198,58.672 90.359,58.512 94.839,58.512 97.042,56.309 IC1.31 ; v1(101.219,44.323) 102.997,44.323 103.378,43.942 IC2.13
MTX: IC1.32 IC2.3 | length 61.6
  Top Layer w0.254: v1(88.9,34.163) 89.094,33.969 89.539,33.969 89.98,33.528 v1(103.251,33.528)
  Bottom Layer w0.254: v1(88.9,34.163) 86.001,34.163 85.852,34.312 85.852,58.42 86.612,59.18 90.409,59.18 90.569,59.02 95.412,59.02 97.323,57.109 IC1.32 ; v1(103.251,33.528) 104.14,33.528 104.648,34.036 IC2.3
NetC3_2: C3.2 C4.P L1.2 R21.2 R24.2 | length 64.3
  Top Layer w1.254: v1(31.877,33.147) 36.222,33.147 36.957,33.882 36.957,51.816 36.195,52.578 v1(32.004,52.578)
  Bottom Layer w1.254: L1.2@11.938,56.721 11.938,56.642 21.336,56.642 25.4,52.578 v1(32.004,52.578) ; C4.P 26.055,32.559 26.897,33.401 28.575,33.401 29.369,34.195 R21.2 29.433,35.751 31.952,35.751 C3.2 32.004,33.278 31.877,33.151 v1(31.877,33.147)
NetC5_P: C5.P D5.C MOV.2 U1.1 | length 55.3
  Top Layer w1.254: MOV.2 14.545,20.976 13.97,21.551 13.97,43.303 16.514,45.847 v1@18.03,45.847
  Bottom Layer w1.254: MOV.2@14.605,20.888 MOV.2 26.828,20.828 26.859,20.859 27.563,20.859 27.686,20.982 D5.C ; U1.1 17.78,45.589 18.034,45.843 v1(18.034,45.847) 18.038,45.847 18.311,46.12 25.293,46.12 26.344,47.171 26.49,47.171 C5.P@26.49,47.317
NetCON1_1: CON1.1 R7.2 R31.1 | length 10.3
  Bottom Layer w0.254: R7.2@138.938,16.732 138.938,14.51 139.097,14.351 139.545,13.903 143.45,13.903 143.637,13.716 143.637,10.762 CON1.1
NetCON1_2: CON1.2 R8.2 R31.2 | length 6.9
  Bottom Layer w0.254: R8.2@136.779,16.732 136.779,14.383 136.747,14.351 136.747,12.572 CON1.2
NetCON2_1: CON2.1 R12.2 R32.1 | length 10.1
  Bottom Layer w0.254: R12.2 115.824,14.764 R32.1 117.126,13.462 120.501,13.462 120.65,13.313 120.65,10.828 CON2.1
NetCON2_2: CON2.2 R11.2 R32.2 | length 6.8
  Bottom Layer w0.254: R11.2@113.538,16.732 113.538,14.7 R32.2 113.633,12.445 CON2.2
NetCON3_1: CON3.1 R16.2 R33.1 | length 10.3
  Bottom Layer w0.254: R16.2 93.377,16.51 93.377,14.351 97.641,14.351 97.79,14.202 97.79,10.716 CON3.1
NetCON3_2: CON3.2 R15.2 R33.2 | length 6.7
  Bottom Layer w0.254: R15.2 91.186,14.51 91.027,14.351 92.758,12.62 CON3.2
NetCON4_1: CON4.1 R20.2 R34.1 | length 6.8
  Bottom Layer w0.254: R20.2 74.549,14.637 74.835,14.351 76.581,12.605 CON4.1
NetCON4_2: CON4.2 R19.2 R34.2 | length 6.4
  Bottom Layer w0.254: CON4.2 71.501,13.367 72.485,14.351 72.39,14.446 R19.2
NetCON5_1: CON5.1 D5.A | length 6.8
  Top Layer w2.254: CON5.1@27.432,10.715 CON5.1
  Bottom Layer w0.381: CON5.1 CON5.1@27.686,10.621
  Bottom Layer w1.254: CON5.1@27.686,10.621 D5.A
NetD1_1: D1.1 IC4.7 R6.2 R8.1 | length 34.1
  Top Layer w0.254: v2(137.033,20.955) 140.455,20.955 141.224,21.724 v1(141.224,24.511)
  Bottom Layer w0.254: R8.1@136.906,19.209 137.033,19.336 v2(137.033,20.955) 136.969,21.018 136.969,22.873 IC4.7 ; v1(141.224,24.511) 142.843,24.511 142.97,24.384 R6.2 143.097,24.511 146.177,24.511 148.717,21.971 148.717,15.389 148.568,15.24 143.278,15.24 143.129,15.389 143.129,17.127 D1.1
NetD1_2: D1.2 IC4.6 R5.2 R7.1 | length 16.5
  Bottom Layer w0.254: R5.2@132.334,23.813 132.782,24.261 132.782,24.848 132.931,24.997 138.049,24.997 138.198,24.848 138.198,24.409 138.176,24.388 IC4.6 138.176,21.082 138.938,20.32 R7.1 139.195,19.238 D1.2
NetD2_1: D2.1 IC5.7 R10.2 R11.1 | length 32.2
  Top Layer w0.254: v1(114.427,20.574) 116.967,20.574 117.475,21.082 v1(117.475,24.511)
  Bottom Layer w0.254: R11.1@113.538,19.082 113.633,19.082 113.986,19.435 113.986,19.53 114.233,19.777 114.233,20.38 v1(114.427,20.574) 114.427,20.811 114.046,21.192 IC5.7 ; v1(117.475,24.511) 117.634,24.67 R10.2 119.793,23.876 124.184,23.876 124.333,23.727 124.333,16.65 123.177,15.494 119.38,15.494 118.872,16.002 D2.1
NetD2_2: D2.2 IC5.6 R9.2 R12.1 | length 12.3
  Bottom Layer w0.254: R9.2 111.061,24.257 114.325,24.257 IC5.6@115.316,23.266 ; IC5.6 115.443,22.428 115.443,19.463 116.11,18.796 D2.2
NetD3_1: D3.1 IC6.7 R14.2 R15.1 | length 38.6
  Top Layer w0.254: v1(91.567,20.701) 95.25,20.701 95.885,21.336 v1(95.885,25.019)
  Bottom Layer w0.254: R15.1 91.186,20.045 91.567,20.426 91.567,20.93 92.075,21.438 IC6.7 ; v1(95.885,25.019) 95.885,24.892 96.107,24.67 R14.2 102.203,24.67 104.521,22.352 104.521,14.689 104.372,14.54 98.871,14.54 97.898,15.513 97.898,16.33 97.525,16.703 D3.1
NetD3_2: D3.2 IC6.6 R13.2 R16.1 | length 15.6
  Bottom Layer w0.254: R13.2 88.106,25.146 92.964,25.146 93.345,24.765 IC6.6 93.345,19.082 R16.1 96.973,18.955 D3.2
NetD4_1: D4.1 IC7.7 R18.2 R19.1 | length 34.4
  Top Layer w0.254: v1(72.39,20.701) 75.057,20.701 75.692,21.336 v1(75.692,25.4)
  Bottom Layer w0.254: R19.1 72.39,21.082 72.517,21.209 72.517,22.809 IC7.7 ; v1(75.692,25.4) 75.914,25.178 R18.2 78.01,24.765 81.153,24.765 83.058,22.86 83.058,15.135 82.909,14.986 78.613,14.986 77.894,15.705 D4.1
NetD4_2: D4.2 IC7.6 R17.2 R20.1 | length 15
  Bottom Layer w0.254: R17.2 68.675,25.273 73.152,25.273 73.914,24.511 IC7.6 73.914,19.59 R20.1 74.901,18.603 D4.2
NetD6_1: D6.1 L1.1 U1.2 | length 25.7
  Bottom Layer w1.254: L1.1 10.326,50.682 10.326,48.602 13.97,44.958 13.97,40.379 14.705,39.644 17.653,39.644 U1.2 17.907,39.644 20.594,39.644 22.5,41.55 26.173,41.55 D6.1
NetD7_A: D7.A R23.2 | length 3.2
  Bottom Layer w1.254: R23.2 31.21,59.722 31.496,59.436 D7.A
NetDS1_1: DS1.1 VR1.3 | length 24.1
  Bottom Layer w1.254: VR1.3 54.867,74.673 54.867,71.244 56.261,69.85 69.496,69.85 70.231,70.585 70.231,71.628 70.266,71.663 DS1.1
NetDS1_3: DS1.3 VR1.2 | length 30.2
  Top Layer w1.254: VR1.2 VR1.2@52.324,69.723
  Bottom Layer w1.254: VR1.2 54.229,67.691 73.533,67.691 75.346,69.504 DS1.3
NetLS1_N: LS1.N Q1.3 | length 18.6
  Bottom Layer w1.254: 21.16,71.152 21.89,71.882 35.136,71.882 35.871,71.147 LS1.N
NetQ1_1: Q1.1 R29.1 R30.1 | length 6.4
  Bottom Layer w1.254: Q1.1 21.97,69.089 21.971,69.088 22.078,69.088 22.11,69.056 22.11,68.949 22.257,68.802 R30.1 22.257,63.341 22.352,63.246 R29.1
NetR21_1: R21.1 R22.2 U1.4 | length 11.4
  Bottom Layer w1.254: U1.4 24.716,36.117 25.273,35.56 26.892,35.56 R21.1 27.051,35.719 R22.2
NetR26_1: R26.1 R27.2 S2.1 S2.2 | length 118.7
  Top Layer w0.254: v1(93.599,62.865) 93.726,62.738 109.347,62.738 v1(109.474,62.611)
  Bottom Layer w0.254: R27.2 62.611,62.865 63.881,64.135 92.329,64.135 v1(93.599,62.865) ; v1(109.474,62.611) 157.512,62.611 R26.1@158.94,61.183 ; R26.1@158.718,60.96 R26.1@158.94,61.183 ; R26.1@159.226,61.468 R26.1@158.94,61.183 ; S2.2@161.925,57.578 161.572,57.931 161.572,58.622 161.163,59.031 161.163,60.843 161.014,60.992 R26.1 R26.1@158.94,61.183 ; S2.2@162.687,57.531 S2.1@175.387,57.531
NetR27_1: R27.1 R28.2 S3.1 S3.2 | length 31.8
  Bottom Layer w0.254: S3.2@45.132,57.451 S3.1 ; S3.1@57.809,57.475 62.587,57.475 62.611,57.499 ; R28.2 62.611,57.499 ; R27.1 62.611,57.499
  Bottom Layer w0.635: S3.1 S3.1@57.809,57.475
  Bottom Layer w1.27: S3.2 45.085,57.404 S3.2@45.132,57.451
NetR28_1: R28.1 S4.1 S4.2 | length 17.8
  Bottom Layer w0.254: S4.2@45.259,42.465 S4.1 57.959,42.291 62.135,42.291 R28.1
  Bottom Layer w1.27: S4.2 45.165,42.465 45.212,42.418 S4.2@45.259,42.465
RE_DE: IC1.29 IC7.2 IC7.3 | length 68.1
  Top Layer w0.254: v1(88.011,62.611) 88.201,62.42 88.201,57.468 v1(88.392,57.277)
  Bottom Layer w0.254: IC7.2 IC7.3 ; IC7.3@73.911,27.932 74.041,28.062 74.041,61.722 74.93,62.611 v1(88.011,62.611) ; v1(88.392,57.277) 94.234,57.277 96.802,54.709 IC1.29
RE_DE1: IC1.12 IC4.2 IC4.3 | length 56.2
  Top Layer w0.254: v1(117.221,34.925) 117.348,35.052 117.348,54.483 v1(117.475,54.61)
  Bottom Layer w0.254: IC1.12 108.992,54.66 117.425,54.66 v1(117.475,54.61) ; v1(117.221,34.925) 136.525,34.925 136.906,34.544 IC4.2 IC4.3
RE_DE2: IC1.13 IC5.2 IC5.3 | length 35.6
  Top Layer w0.254: v1(113.919,42.799) 116.078,44.958 116.078,53.213 v1(116.205,53.34)
  Bottom Layer w0.254: IC1.13 115.361,53.909 115.93,53.34 v1(116.205,53.34) ; v1(113.919,42.799) 113.983,42.735 113.983,27.546 IC5.2 IC5.3
RE_DE3: IC1.11 IC6.2 IC6.3 | length 56.8
  Top Layer w0.254: v1(93.091,32.512) 92.964,32.639 86.763,32.639 86.614,32.788 86.614,51.689 91.565,56.64 106.805,56.64 v1(106.807,56.642)
  Bottom Layer w0.254: IC6.2 93.218,27.737 IC6.3 93.218,27.864 93.218,32.385 v1(93.091,32.512) ; v1(106.807,56.642) 106.807,56.367 107.273,55.901 107.273,55.689 107.453,55.509 IC1.11
RS: DS1.4 IC1.2 | length 40.2
  Top Layer w0.254: v1(92.075,67.945) 92.138,67.882 101.409,67.882 v1(101.473,67.818)
  Bottom Layer w0.254: DS1.4 77.886,68.545 78.613,67.818 91.948,67.818 v1(92.075,67.945) ; v1(101.473,67.818) 101.592,67.699 101.592,66.81 102.705,65.697 IC1.2
RST: IC1.17 PROGRAM1.05 R3.2 | length 34.8
  Bottom Layer w0.254: IC1.17 124.935,50.071 126.238,48.768 126.238,41.783 126.873,41.148 130.175,41.148 131.572,39.751 PROGRAM1.05
RW: DS1.5 IC1.3 | length 38.4
  Top Layer w0.254: v1(91.948,69.723) 102.235,69.723 103.378,68.58 v1(103.378,67.437)
  Bottom Layer w0.254: DS1.5 80.426,70.323 80.899,69.85 91.821,69.85 v1(91.948,69.723) ; v1(103.378,67.437) 103.505,67.31 IC1.3
RX: IC1.9 IC7.1 | length 82
  Top Layer w0.254: v1(92.583,61.087) 92.773,61.277 110.807,61.277 v1(110.998,61.468)
  Bottom Layer w0.254: IC7.1 71.374,62.865 72.136,63.627 90.043,63.627 v1(92.583,61.087) ; IC1.9 110.068,57.109 110.998,58.039 v1(110.998,61.468)
RX1: IC2.14 IC4.1 | length 52
  Bottom Layer w0.254: IC2.14 104.648,45.444 104.797,45.593 115.675,45.593 115.824,45.444 115.824,32.661 115.973,32.512 131.296,32.512 131.445,32.363 131.445,28.448 132.207,27.686 135.484,27.686 135.636,27.838 IC4.1
RX2: IC2.15 IC5.1 | length 20.6
  Bottom Layer w0.254: IC2.15 105.791,41.701 105.791,40.259 106.68,39.37 112.268,39.37 112.776,38.862 IC5.1
RX3: IC2.12 IC6.1 | length 24.5
  Bottom Layer w0.254: IC6.1 90.805,38.862 91.821,39.878 101.6,39.878 102.108,40.386 IC2.12
SCL: IC1.18 PROGRAM1.01 | length 27.1
  Bottom Layer w0.254: IC1.18 106.705,48.536 106.854,48.387 120.777,48.387 121.666,47.498 121.666,37.669 PROGRAM1.01
SCL1: IC1.15 IC3.6 R1.1 | length 30.5
  Bottom Layer w0.254: IC1.15 127.112,52.309 128.016,53.213 133.096,53.213 133.477,52.832 133.477,51.53 R1.1 IC3.6
SDA: IC1.19 PROGRAM1.03 | length 36.3
  Bottom Layer w0.254: IC1.19 105.905,47.012 106.054,46.863 117.983,46.863 118.745,46.101 118.745,36.068 119.253,35.56 126.492,35.56 126.746,35.814 126.746,37.161 PROGRAM1.03
SDA1: IC1.16 IC3.5 R2.1 | length 32.7
  Bottom Layer w0.254: IC1.16 127.031,51.509 127.635,50.905 127.635,49.022 128.778,47.879 133.106,47.879 133.255,48.028 133.255,49.276 135.763,49.276 136.652,50.165 IC3.5
TX: IC1.10 IC7.4 | length 78
  Top Layer w0.254: v1(90.99,60.036) 91.036,59.99 112.095,59.99 v1(112.141,59.944)
  Bottom Layer w0.254: IC7.4 75.184,28.575 75.032,28.727 74.832,28.727 74.683,28.876 74.683,60.967 75.311,61.595 89.431,61.595 v1(90.99,60.036) ; IC1.10 109.062,56.428 111.165,56.428 112.141,57.404 v1(112.141,59.944)
TX1: IC2.5 IC4.4 | length 50
  Bottom Layer w0.254: IC2.5 102.108,28.829 106.172,24.765 116.292,24.765 119.721,28.194 127.386,28.194 129.418,26.162 138.455,26.162 139.446,27.153 IC4.4
TX2: IC2.2 IC5.4 | length 21.8
  Bottom Layer w0.254: IC2.2 105.918,27.686 107.827,25.777 116.437,25.777 116.586,25.926 IC5.4
TX3: IC2.1 IC6.4 | length 25.6
  Bottom Layer w0.254: IC6.4 94.615,38.1 95.377,38.862 106.807,38.862 107.315,38.354 107.315,36.531 IC2.1
VR0: C1.1 IC1.27 | length 8.4
  Bottom Layer w0.254: C1.1 C1.1@93.333,51.666 ; C1.1@93.333,51.966 C1.1@93.333,51.666 ; IC1.27 100.348,52.99 94.657,52.99 93.7,52.033 93.55,52.033 93.333,51.816 C1.1@93.333,51.666
pads on no net: DS1.7 DS1.8 DS1.9 DS1.10 DS1.SH1 DS1.SH2 DS1.SH3 DS1.SH4 H1.1 H2.1 H3.1 H4.1 IC1.8 IC1.14 IC1.20 IC1.22 IC1.23 IC2.4 IC2.11
copper on no net: | length 520
  Top Layer w0.254: 0,0 180,0 180,80 0,80 0,0

## Polygon pours and split planes (outlines as drawn)
GND on Bottom Layer "GND_L02_P000" (solid, remove dead copper, pour order 0): 11.557,0.127 11.811,0.381 11.811,10.287 0.254,10.287 0.254,70.739 10.16,70.739 10.287,70.866 10.287,79.883 169.799,79.883 169.926,79.756 169.926,70.485 179.959,70.485 180.086,70.612 180.086,10.541 168.021,10.541 167.894,10.414 167.894,-0.127 11.811,-0.127
GND on Top Layer "GND_L01_P001" (solid, remove dead copper, pour order 1): 11.684,-0.381 11.684,10.033 0.127,10.033 0.127,70.485 10.033,70.485 10.16,70.612 10.16,79.629 169.672,79.629 169.799,79.502 169.799,70.231 179.906,70.231 179.959,70.178 179.959,10.287 167.894,10.287 167.767,10.16 167.767,-0.381

## Silkscreen, mask and mechanical layers (free items; w line width, h text height)
Top Overlay:
  text "GND    25V" at 17.272,14.351 h1.52
Bottom Overlay:
  text "25V           GND" at 37.211,4.191 h1.52